# Altium PCB PCB1.PcbDoc (part 3 of 3)
Units mm, origin at the board's own origin, x right, y up, seen from the top; angles counter-clockwise.
Board outline 145 x 122 mm, 4 copper layers (Top Layer, Middle Layer 1, Middle Layer 2, Bottom Layer), stack 1.466 mm thick; 149 components, 242 nets, 995 pads, 740 vias.
Unrouted connection lines stored in the file: 53.
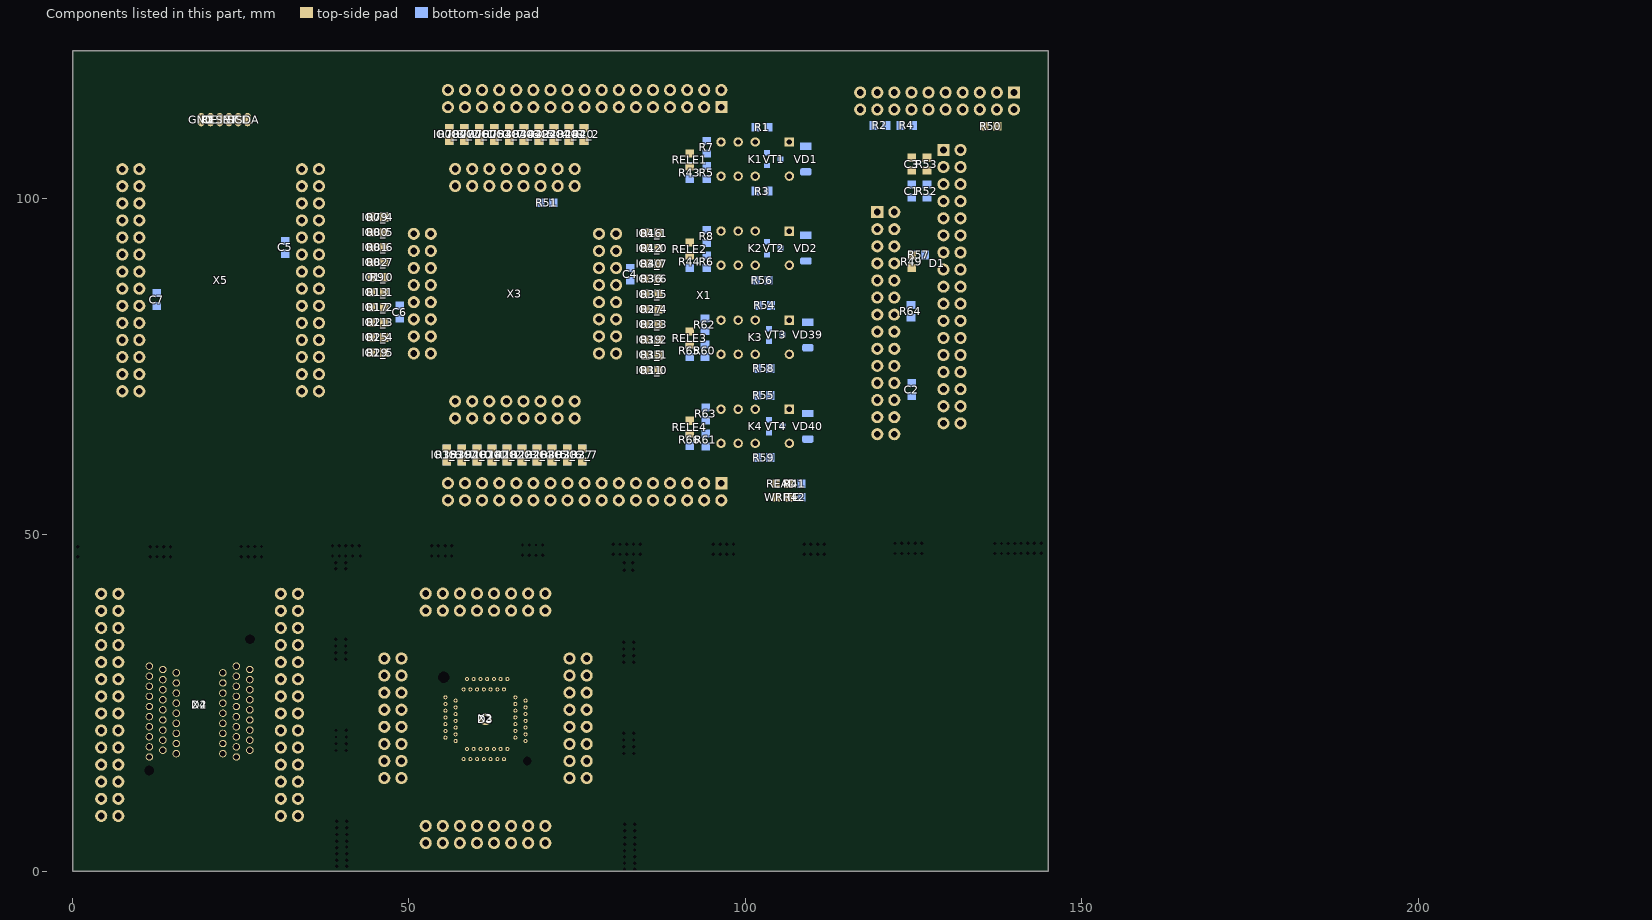
[diagram p5: the components of this part, seen from the top]

## Other copper
Top Layer:
  pour cut-out: 21.625,28.875 21.625,27.5 23.125,27.5
  pour cut-out: 29.846,41.26 29.846,38.72 30.955,38.72
  pour cut-out: 25.25,20.375 25.25,18.5 27.5,18.5 27.5,20.125
  pour cut-out: 21.625,22.75 21.625,21.304 23.5,21.304 23.5,22.625
  pour cut-out: 76.066,107.68 77.813,107.68 77.813,107.927
  pour cut-out: 84.827,95.725 82.75,95.725 82.75,94.319
  pour cut-out: 78.099,94.185 78.099,91.786 77.46,91.786
  pour cut-out: 78.123,95.912 76.625,95.912 76.625,95.125
  pour cut-out: 129.45,103.586 127,103.586 127,104.175
  pour cut-out: 129.45,105.804 127,105.804 127,104.175
  pour cut-out: 7.38,105.494 9.92,105.494 9.92,104.404
  pour cut-out: 49.984,31.64 49.984,29.1 48.875,29.1
  pour cut-out: 46.335,32.749 48.875,32.749 48.875,31.64
  pour cut-out: 87.875,73.65 87.875,72.75 84.375,72.75
  pour cut-out: 87.875,73.65 84.375,73.65 84.375,72.75
  pour cut-out: 54.359,79.525 54.359,76.985 53.25,76.985
  pour cut-out: 46.45,77.712 50.71,77.712 50.71,79.866
  pour cut-out: 80.79,75.876 85.3,75.876 85.3,76.764
  pour cut-out: 80.623,93.334 85.175,93.334 85.175,92.611
  pour cut-out: 51.875,78.125 51.875,75.838 54.296,75.838
  pour cut-out: 55.713,69.748 54.5,69.748 54.5,69
  pour cut-out: 70.875,68.56 70.875,63.25 75.25,63.25
  pour cut-out: 98.695,96.052 94.25,96.052 94.25,95
  pour cut-out: 123.9,92.375 123.9,88.875 125.6,88.875 125.6,92.375
  pour cut-out: 131.99,103.586 129.45,103.586 129.45,104.695
  pour cut-out: 129.45,105.804 131.99,105.804 131.99,104.695
  pour cut-out: 126.15,106.875 126.15,103.375 127.85,103.375 127.85,106.875
  pour cut-out: 134.75,111.6 134.75,109.9 138.25,109.9 138.25,111.6
  pour cut-out: 76.875,111.25 78.65,111.25 78.65,113.595
  pour cut-out: 79.759,113.595 79.759,110.75 79.201,110.75
  pour cut-out: 65.95,114.704 78.65,114.704 78.65,113.595
  pour cut-out: 64.841,113.595 64.841,112 65.375,112
  pour cut-out: 74.628,111.3 76.875,111.3 76.875,107.68 74.698,107.68
  pour cut-out: 74.64,103.306 76.75,103.306 76.75,105.625
  pour cut-out: 74.64,103.306 72.1,103.306 72.1,104.415
  pour cut-out: 73.209,104.415 73.209,101.875 72.1,101.875
  pour cut-out: 57.051,104.083 57.051,100.771 60.312,100.771
  pour cut-out: 58.125,104.813 58.125,103.125 60.875,103.125
  pour cut-out: 59.4,100.766 72.1,100.766 72.1,101.875
  pour cut-out: 58.125,105.125 60.625,105.125 60.625,106.197
  pour cut-out: 56.987,105.562 56.987,108 58.125,108
  pour cut-out: 55.15,111.3 55.15,107.8 74.628,107.8 74.628,111.3
  pour cut-out: 123.259,80.215 123.259,90.375 122.15,90.375
  pour cut-out: 119.61,79.106 122.15,79.106 122.15,80.215
  pour cut-out: 118.501,90.375 118.501,80.215 119.61,80.215
  pour cut-out: 118.501,90.375 118.501,92.915 119.61,92.915
  pour cut-out: 123.259,92.915 123.259,90.375 122.15,90.375
  pour cut-out: 119.61,94.024 122.15,94.024 122.15,92.915
  pour cut-out: 118.501,92.915 118.501,91.645 119.61,91.645
  pour cut-out: 111.75,94.125 111.75,92.5 111.125,92.5
  pour cut-out: 99.838,95.176 99.838,92.5 98.573,92.5
  pour cut-out: 98.573,94.349 98.573,92.5 99.5,92.5
  pour cut-out: 93.125,97.125 94.25,97.125 94.25,96.266
  pour cut-out: 99.838,90.096 99.838,92.5 98.5,92.5
  pour cut-out: 102.378,63.617 102.378,65.875 100.625,65.875
  pour cut-out: 98.93,62.709 101.47,62.709 101.47,63.617
  pour cut-out: 93.615,63.175 93.615,62.255 94.125,62.255
  pour cut-out: 96.39,67.789 98.93,67.789 98.93,68.697
  pour cut-out: 95.482,68.697 95.482,69.875 96.125,69.875
  pour cut-out: 102.378,76.856 102.378,78.375 101,78.375
  pour cut-out: 98.93,75.948 101.47,75.948 101.47,76.856
  pour cut-out: 99.165,80.582 99.165,78.25 98.25,78.25
  pour cut-out: 84.375,95.725 87.875,95.725 87.875,73.65 84.375,73.65
  pour cut-out: 79.681,79.525 79.681,76.985 80.79,76.985
  pour cut-out: 79.681,79.525 79.681,82.065 80.79,82.065
  pour cut-out: 78.25,80.956 80.79,80.956 80.79,82.065
  pour cut-out: 78.25,93.334 80.79,93.334 80.79,92.225
  pour cut-out: 81.899,76.985 81.899,92.225 80.79,92.225
  pour cut-out: 78.25,75.876 80.79,75.876 80.79,76.985
  pour cut-out: 77.141,92.225 77.141,82.065 78.25,82.065
  pour cut-out: 54.775,60.147 76.6,60.147 76.6,63.647 54.75,63.647 54.75,63.625
  pour cut-out: 74.459,69.506 74.459,71.5 72.813,71.5
  pour cut-out: 74.459,69.506 74.459,67.756 73.334,67.756
  pour cut-out: 74.513,66.188 73.375,66.188 73.375,67.125
  pour cut-out: 72.227,66.188 73.375,66.188 73.375,67.125
  pour cut-out: 71.973,66.188 70.875,66.188 70.875,67.375
  pour cut-out: 70.875,67.75 73.375,67.75 73.375,68.6
  pour cut-out: 55.875,69.658 59.4,69.658 59.4,68.537
  pour cut-out: 55.713,69.748 55.713,67.335 56.86,67.335
  pour cut-out: 69.764,66.252 70.875,66.252 70.875,67.023
  pour cut-out: 73.209,69.875 73.209,71.625 72.25,71.625
  pour cut-out: 59.4,70.984 72.1,70.984 72.1,69.875
  pour cut-out: 57.147,66.263 69.56,66.263 69.56,67.335
  pour cut-out: 53.377,75.838 54.5,75.838 54.5,76.75
  pour cut-out: 53.123,75.838 52,75.838 52,76.625
  pour cut-out: 50.837,75.838 52,75.838 52,76.625
  pour cut-out: 49.563,77.112 49.563,79.525 50.71,79.525
  pour cut-out: 53.25,90.794 50.698,90.794 50.698,89.673
  pour cut-out: 54.359,79.525 54.359,89.685 53.25,89.685
  pour cut-out: 50.71,78.416 53.25,78.416 53.25,79.525
  pour cut-out: 49.601,79.525 49.601,82.065 50.71,82.065
  pour cut-out: 51.819,92.225 51.819,79.525 50.71,79.525
  pour cut-out: 53.25,93.656 50.605,93.656 50.605,94.87
  pour cut-out: 51.819,92.225 51.819,94.765 50.71,94.765
  pour cut-out: 50.71,95.874 53.25,95.874 53.25,94.765
  pour cut-out: 43.625,98.1 47.125,98.1 47.125,76.275 43.625,76.275
  pour cut-out: 35.511,76.445 35.511,78.985 36.62,78.985
  pour cut-out: 34.08,77.876 36.62,77.876 36.62,78.985
  pour cut-out: 34.08,70.256 36.62,70.256 36.62,71.365
  pour cut-out: 35.511,76.445 35.511,73.905 36.62,73.905
  pour cut-out: 34.08,75.014 36.62,75.014 36.62,73.905
  pour cut-out: 32.971,71.365 32.971,73.905 34.08,73.905
  pour cut-out: 37.729,81.525 37.729,71.365 36.62,71.365
  pour cut-out: 36.62,82.634 34.08,82.634 34.08,81.525
  pour cut-out: 35.189,84.065 35.189,81.525 34.08,81.525
  pour cut-out: 35.189,84.065 35.189,86.605 34.08,86.605
  pour cut-out: 36.62,97.874 34.08,97.874 34.08,96.765
  pour cut-out: 35.189,99.305 35.189,96.765 34.08,96.765
  pour cut-out: 36.62,85.496 34.08,85.496 34.08,86.605
  pour cut-out: 37.729,96.765 37.729,86.605 36.62,86.605
  pour cut-out: 35.125,99.375 35.125,101.845 34.08,101.845
  pour cut-out: 36.62,100.736 34.08,100.736 34.08,101.845
  pour cut-out: 37.729,104.385 37.729,101.845 36.62,101.845
  pour cut-out: 33.004,104.13 33.004,78.985 34.08,78.985
  pour cut-out: 34.08,103.276 36.62,103.276 36.62,104.385
  pour cut-out: 26,110.544 20.5,110.544 20.5,111.75
  pour cut-out: 20.5,112.956 26,112.956 26,111.75
  pour cut-out: 11.029,94.225 11.029,91.685 9.92,91.685
  pour cut-out: 8.811,91.685 8.811,89.145 9.92,89.145
  pour cut-out: 7.38,90.254 9.92,90.254 9.92,89.145
  pour cut-out: 6.271,78.985 6.271,89.145 7.38,89.145
  pour cut-out: 7.38,77.876 9.92,77.876 9.92,78.985
  pour cut-out: 8.811,76.445 8.811,78.985 9.92,78.985
  pour cut-out: 8.811,76.445 8.811,73.905 9.92,73.905
  pour cut-out: 7.38,75.014 9.92,75.014 9.92,73.905
  pour cut-out: 6.271,71.365 6.271,73.905 7.38,73.905
  pour cut-out: 9.92,70.256 7.38,70.256 7.38,71.365
  pour cut-out: 11.029,91.685 11.029,71.365 9.92,71.365
  pour cut-out: 8.811,91.685 8.811,94.225 9.92,94.225
  pour cut-out: 8.489,99.305 8.489,101.845 7.38,101.845
  pour cut-out: 8.489,99.305 8.489,96.765 7.38,96.765
  pour cut-out: 9.92,97.874 7.38,97.874 7.38,96.765
  pour cut-out: 11.029,94.225 11.029,96.765 9.92,96.765
  pour cut-out: 7.38,93.116 9.92,93.116 9.92,94.225
  pour cut-out: 6.271,101.845 6.271,94.225 7.38,94.225
  pour cut-out: 7.38,100.736 9.92,100.736 9.92,101.845
  pour cut-out: 6.271,104.385 6.271,101.845 7.38,101.845
  pour cut-out: 11.029,104.385 11.029,101.845 9.92,101.845
  pour cut-out: 7.38,103.276 9.92,103.276 9.92,104.385
  pour cut-out: 72.766,13.86 72.766,16.4 73.875,16.4
  pour cut-out: 76.415,12.751 73.875,12.751 73.875,13.86
  pour cut-out: 77.524,29.1 77.524,13.86 76.415,13.86
  pour cut-out: 75.255,30.49 74.625,30.49 74.625,31.125
  pour cut-out: 72.728,31.513 72.728,30 73.25,30
  pour cut-out: 68.834,4.21 68.834,5.75 68.25,5.75
  pour cut-out: 69.115,5.37 69.115,6 69.625,6
  pour cut-out: 51.376,4.21 51.376,6.75 52.485,6.75
  pour cut-out: 67.725,3.101 52.485,3.101 52.485,4.21
  pour cut-out: 70.138,7.897 68.125,7.897 68.125,6.875
  pour cut-out: 52.485,7.859 67.725,7.859 67.725,6.75
  pour cut-out: 58.125,17.18 64.125,17.18 64.125,16.67
  pour cut-out: 58.625,17.685 64.625,17.685 64.625,18.195
  pour cut-out: 64.625,18.705 58.625,18.705 58.625,18.195
  pour cut-out: 66.82,25.375 66.82,19.375 67.33,19.375
  pour cut-out: 66.315,19.875 66.315,25.875 65.805,25.875
  pour cut-out: 65.295,25.875 65.295,19.875 65.805,19.875
  pour cut-out: 64.125,26.545 58.125,26.545 58.125,27.055
  pour cut-out: 58.125,27.565 64.125,27.565 64.125,27.055
  pour cut-out: 58.625,28.07 64.625,28.07 64.625,28.58
  pour cut-out: 57.455,19.375 57.455,25.375 56.945,25.375
  pour cut-out: 56.435,25.375 56.435,19.375 56.945,19.375
  pour cut-out: 55.93,25.875 55.93,19.875 55.42,19.875
  pour cut-out: 50.022,13.987 50.022,16.4 48.875,16.4
  pour cut-out: 47.495,15.01 48.125,15.01 48.125,14.375
  pour cut-out: 45.226,31.64 45.226,16.4 46.335,16.4
  pour cut-out: 52.612,37.603 55.025,37.603 55.025,38.75
  pour cut-out: 53.635,40.13 53.635,39.5 53,39.5
  pour cut-out: 70.265,37.641 53.916,37.641 53.916,41.29
  pour cut-out: 71.374,41.29 71.374,38.75 70.265,38.75
  pour cut-out: 55.025,42.399 70.265,42.399 70.265,41.29
  pour cut-out: 33.495,7.131 30.875,7.131 30.875,8.24 30.955,8.24
  pour cut-out: 33.286,37.84 33.286,31 28.5,31 28.5,38.625
  pour cut-out: 34.604,33.64 34.604,23.48 33.495,23.48
  pour cut-out: 33.32,35.507 33.32,33.64 30.086,33.64
  pour cut-out: 33.286,36.96 33.286,38.72 30.237,38.72
  pour cut-out: 34.604,41.26 34.604,38.72 33.495,38.72
  pour cut-out: 30.955,42.369 33.495,42.369 33.495,41.26
  pour cut-out: 33.333,21.961 33.333,18.4 30.955,18.4
  pour cut-out: 33.308,20 33.308,18.4 30.536,18.4
  pour cut-out: 33.333,21.961 33.333,23.48 30.701,23.48
  pour cut-out: 33.495,22.371 30.955,22.371 30.955,23.48
  pour cut-out: 33.495,19.509 30.955,19.509 30.955,18.4
  pour cut-out: 34.604,13.32 34.604,18.4 33.495,18.4
  pour cut-out: 29.25,14.75 32.5,14.75 32.5,11.875 29.625,11.875
  pour cut-out: 34.604,8.24 34.604,13.32 33.495,13.32
  pour cut-out: 21.75,20 21.75,18.125 23.584,18.125 23.584,20
  pour cut-out: 24.536,31.231 30.955,31.231 30.955,28.56
  pour cut-out: 24.178,31.235 21.609,31.235 21.609,29.696
  pour cut-out: 24.178,16.265 21.584,16.265 21.584,17.5
  pour cut-out: 21.584,29.5 21.584,17.5 22.34,17.5
  pour cut-out: 15.41,16.744 11.41,16.744 11.41,18.5
  pour cut-out: 13.606,30.731 16.166,30.731 16.166,29.5
  pour cut-out: 16.166,29.5 16.166,17.5 15.41,17.5
  pour cut-out: 14.654,17.5 14.654,29.5 15.41,29.5
  pour cut-out: 11.75,28.25 13.875,28.25 13.875,24.25 12.375,24.25
  pour cut-out: 14.166,18 14.166,30 13.41,30
  pour cut-out: 13.41,17.244 11.41,17.244 11.41,18.5
  pour cut-out: 11.375,14.067 6.795,14.067 6.795,15.86
  pour cut-out: 12.308,15 12.308,21.5 11.41,21.5
  pour cut-out: 4.536,12.18 4.536,10.787 6.949,10.787
  pour cut-out: 4.255,7.131 6.795,7.131 6.795,8.24
  pour cut-out: 3.146,10.78 3.146,8.24 4.255,8.24
  pour cut-out: 4.382,12.173 6.795,12.173 6.795,13.32
  pour cut-out: 4.526,14.395 4.526,15.788 6.939,15.788
  pour cut-out: 4.255,14.751 6.795,14.751 6.795,15.86
  pour cut-out: 4.382,14.467 6.75,14.467 6.75,13.32 6.795,13.32
  pour cut-out: 3.146,23.48 3.146,15.86 4.255,15.86
  pour cut-out: 3.146,26.02 3.146,23.48 4.255,23.48
  pour cut-out: 8.213,27.625 8.213,24.5 11.41,24.5
  pour cut-out: 6.795,27.129 11.41,27.129 11.41,26
  pour cut-out: 4.255,27.129 6.795,27.129 6.795,26.02
  pour cut-out: 6.795,29.991 11.41,29.991 11.41,30.5
  pour cut-out: 4.255,29.991 6.795,29.991 6.795,31.1
  pour cut-out: 3.146,33.64 3.146,31.1 4.255,31.1
  pour cut-out: 5.125,38.125 8.375,38.125 8.375,34.375 4.875,34.375
  pour cut-out: 3.146,38.72 3.146,36.18 4.255,36.18
  pour cut-out: 3.146,36.18 3.146,33.64 4.255,33.64
  pour cut-out: 6.795,37.611 11.375,37.611 11.375,38.25
  pour cut-out: 4.255,37.611 6.795,37.611 6.795,38.72
  pour cut-out: 3.146,41.26 3.146,38.72 4.255,38.72
  pour cut-out: 4.255,42.369 6.795,42.369 6.795,41.26
Middle Layer 1:
  pour cut-out: 27.096,30 27.096,27 26.34,27
  pour cut-out: 25.584,30 25.584,27 26.34,27
  pour cut-out: 27.096,21 27.096,24 26.34,24
  pour cut-out: 25.584,24 25.584,21 26.34,21
  pour cut-out: 23.096,17.5 23.096,20.5 22.34,20.5
  pour cut-out: 21.584,20.5 21.584,17.5 22.34,17.5
  pour cut-out: 23.096,23.5 23.096,26.5 22.34,26.5
  pour cut-out: 21.584,26.5 21.584,23.5 22.34,23.5
  pour cut-out: 82.071,104.4 82.071,106.875 83,106.875
  pour cut-out: 50.71,95.874 52.141,95.874 53.25,94.765
  pour cut-out: 44.23,91.013 49.092,95.874 50.71,95.874
  pour cut-out: 43.062,88.129 43.062,89.899 44.065,90.902
  pour cut-out: 70.5,69.125 73.125,68.875 73.25,65.625 70.625,65.625
  pour cut-out: 129.45,65.486 126.25,65.486 126.25,66.25
  pour cut-out: 133.099,66.595 133.099,69.135 131.99,69.135
  pour cut-out: 129.45,65.486 131.99,65.486 131.99,66.595
  pour cut-out: 128.341,66.595 128.341,69.135 129.45,69.135
  pour cut-out: 131.99,68.026 129.45,68.026 129.45,69.135
  pour cut-out: 129.45,70.244 131.99,70.244 131.99,69.135
  pour cut-out: 53.25,78.416 55,78.416 55,79.125
  pour cut-out: 53.25,78.416 52,78.416 52,79
  pour cut-out: 49.375,77.875 49.375,75.25 51.5,75.625 51.75,78
  pour cut-out: 55.79,58.804 53.625,58.804 53.625,57.75
  pour cut-out: 93.89,54.046 55.79,54.046 55.79,55.155
  pour cut-out: 94.999,57.695 94.999,55.155 93.89,55.155
  pour cut-out: 55.79,58.804 93.89,58.804 93.89,57.695
  pour cut-out: 56.86,68.444 59.4,68.444 59.4,67.335
  pour cut-out: 69.56,66.252 70.875,66.252 70.875,67.25
  pour cut-out: 56.656,66.252 69.56,66.252 69.56,67.335
  pour cut-out: 58.291,69.875 58.291,67.335 59.4,67.335
  pour cut-out: 72.1,68.766 59.4,68.766 59.4,69.875
  pour cut-out: 59.4,70.984 72.1,70.984 72.1,69.875
  pour cut-out: 81.905,87.145 81.905,89.75 80.625,89.75
  pour cut-out: 78.25,86.036 80.79,86.036 80.79,87.145
  pour cut-out: 77.141,92.225 77.141,87.145 78.25,87.145
  pour cut-out: 58.125,105.125 58.125,102.875 60.75,102.875 60.75,105.75
  pour cut-out: 65.95,117.244 78.65,117.244 78.65,116.135
  pour cut-out: 65.95,117.244 64.75,117.244 64.75,116.75
  pour cut-out: 58.33,112.486 68.49,112.486 68.49,113.595
  pour cut-out: 76.11,114.704 58.33,114.704 58.33,113.595
  pour cut-out: 76.11,114.704 78.65,114.704 78.65,113.595
  pour cut-out: 76.51,110.5 76.51,113.595 76.11,113.595
  pour cut-out: 77.541,113.595 77.541,109.75 78.375,109.75
  pour cut-out: 81.078,105.437 84.25,105.437 84.25,106.375
  pour cut-out: 77.541,116.135 77.541,113.595 78.65,113.595
  pour cut-out: 96.43,117.244 78.65,117.244 78.65,116.135
  pour cut-out: 73.209,101.875 73.209,104.415 72.1,104.415
  pour cut-out: 74.64,103.306 72.1,103.306 72.1,104.415
  pour cut-out: 75.749,104.415 75.749,106.625 74.875,106.625
  pour cut-out: 59.4,100.766 72.1,100.766 72.1,101.875
  pour cut-out: 55.504,91.925 55.504,89 54.75,89
  pour cut-out: 51.75,93.5 54.75,93.5 54.5,91.125 51.9,90.875
  pour cut-out: 6.271,86.605 6.271,89.145 7.38,89.145
  pour cut-out: 9.92,77.876 14.375,77.876 14.375,79.5
  pour cut-out: 7.38,77.876 9.92,77.876 9.92,78.985
  pour cut-out: 6.271,86.605 6.271,78.985 7.38,78.985
  pour cut-out: 7.38,90.254 9.92,90.254 9.92,89.145
  pour cut-out: 8.811,91.685 8.811,89.145 9.92,89.145
  pour cut-out: 8.811,91.685 8.811,94.225 9.92,94.225
  pour cut-out: 7.38,93.116 9.92,93.116 9.92,94.225
  pour cut-out: 6.271,96.765 6.271,94.225 7.38,94.225
  pour cut-out: 9.92,97.874 7.38,97.874 7.38,96.765
  pour cut-out: 64.625,28.07 59.625,28.07 59.625,28.58
  pour cut-out: 59.625,29.09 64.625,29.09 64.625,28.58
  pour cut-out: 63.125,26.545 58.125,26.545 58.125,27.055
  pour cut-out: 58.125,27.565 63.125,27.565 63.125,27.055
  pour cut-out: 65.295,25.875 65.295,21.875 65.805,21.875
  pour cut-out: 66.315,21.875 66.315,25.875 65.805,25.875
  pour cut-out: 66.82,25.375 66.82,19.375 67.33,19.375
  pour cut-out: 67.84,19.375 67.84,25.375 67.33,25.375
  pour cut-out: 64.625,18.705 59.625,18.705 59.625,18.195
  pour cut-out: 59.625,17.685 64.625,17.685 64.625,18.195
  pour cut-out: 63.125,17.18 58.125,17.18 58.125,16.67
  pour cut-out: 58.125,16.16 63.125,16.16 63.125,16.67
  pour cut-out: 57.455,19.375 57.455,23.375 56.945,23.375
  pour cut-out: 56.435,23.375 56.435,19.375 56.945,19.375
  pour cut-out: 55.93,19.875 55.93,25.875 55.42,25.875
  pour cut-out: 54.91,25.875 54.91,19.875 55.42,19.875
  pour cut-out: 27.096,27 27.096,24 26.34,24
  pour cut-out: 25.584,24 25.584,27 26.34,27
  pour cut-out: 25.096,30.5 25.096,17 24.34,17
  pour cut-out: 23.584,17 23.584,30.5 24.34,30.5
  pour cut-out: 16.166,26.5 16.166,17.5 15.41,17.5
  pour cut-out: 14.654,17.5 14.654,26.5 15.41,26.5
  pour cut-out: 14.166,21 14.166,24 13.41,24
  pour cut-out: 12.654,24 12.654,21 13.41,21
  pour cut-out: 14.166,27 14.166,30 13.41,30
  pour cut-out: 12.654,30 12.654,27 13.41,27
  pour cut-out: 12.166,17 12.166,30.5 11.41,30.5
  pour cut-out: 10.654,30.5 10.654,17 11.41,17
Middle Layer 2:
  pour cut-out: 27.096,27 27.096,30 26.34,30
  pour cut-out: 25.584,30 25.584,27 26.34,27
  pour cut-out: 27.096,18 27.096,24 26.34,24
  pour cut-out: 25.584,24 25.584,18 26.34,18
  pour cut-out: 23.096,17.5 23.096,28 22.34,28
  pour cut-out: 21.584,26.5 21.584,17.5 22.34,17.5
  pour cut-out: 54.359,80.775 54.359,78.275 53.109,78.275
  pour cut-out: 54.375,83.375 54.375,80.634 53.25,80.634
  pour cut-out: 118.34,66.285 118.34,63.866 122.15,63.866
  pour cut-out: 87.075,73.99 85.75,73.99 85.75,74.25
  pour cut-out: 87.585,83.556 87.585,74.344 87.27,74.029
  pour cut-out: 87.435,83.916 83.689,87.451 81.899,87.451
  pour cut-out: 75.75,61.456 77.375,61.456 77.375,61
  pour cut-out: 75.24,60.947 75.24,59.5 75.5,59.5
  pour cut-out: 54.375,88.375 54.375,85.875 53.25,85.875
  pour cut-out: 59.875,83.375 59.875,84.375 60.75,84.375
  pour cut-out: 79.508,75.437 85,75.437 85,77.5
  pour cut-out: 51.819,92.225 51.819,89.673 50.698,89.673
  pour cut-out: 42.75,82.875 39.85,82.875 39.85,84.525
  pour cut-out: 76.204,103.055 76.204,106.75 75.206,106.75
  pour cut-out: 73.25,103 73.25,100.875 75.875,100.875 75.875,102.625
  pour cut-out: 61.94,105.524 67.02,105.524 67.02,104.415
  pour cut-out: 60.831,104.415 60.831,101.875 61.94,101.875
  pour cut-out: 59.4,102.984 61.94,102.984 61.94,101.875
  pour cut-out: 119.61,76.244 122.15,76.244 122.15,75.135
  pour cut-out: 123.259,75.135 123.259,72.595 122.15,72.595
  pour cut-out: 118.501,72.595 118.501,75.135 119.61,75.135
  pour cut-out: 118.501,72.595 118.501,70.055 119.61,70.055
  pour cut-out: 123.259,64.975 123.259,67.515 122.15,67.515
  pour cut-out: 121.041,64.975 121.041,67.515 122.15,67.515
  pour cut-out: 123.259,70.055 123.259,67.515 122.15,67.515
  pour cut-out: 119.61,71.164 122.15,71.164 122.15,70.055
  pour cut-out: 129.45,88.346 127.5,88.346 127.5,90.045
  pour cut-out: 130.559,89.455 130.559,91.995 129.45,91.995
  pour cut-out: 130.559,91.995 130.559,94.535 129.45,94.535
  pour cut-out: 131.99,93.426 129.45,93.426 129.45,94.535
  pour cut-out: 133.099,97.075 133.099,94.535 131.99,94.535
  pour cut-out: 129.45,98.184 131.99,98.184 131.99,97.075
  pour cut-out: 128.341,97.075 128.341,94.535 129.45,94.535
  pour cut-out: 73.57,58.804 76.11,58.804 76.11,57.695
  pour cut-out: 72.461,55.155 72.461,57.695 73.57,57.695
  pour cut-out: 93.89,54.046 73.57,54.046 73.57,55.155
  pour cut-out: 94.999,57.695 94.999,55.155 93.89,55.155
  pour cut-out: 93.89,58.804 91.35,58.804 91.35,57.695
  pour cut-out: 55.751,67.335 55.751,64.5 57.125,64.5
  pour cut-out: 58.291,69.875 58.291,67.335 59.4,67.335
  pour cut-out: 56.86,68.444 59.4,68.444 59.4,67.335
  pour cut-out: 58.291,69.875 58.291,71.375 58.875,71.375
  pour cut-out: 69.56,66.226 64.48,66.226 64.48,67.335
  pour cut-out: 70.669,67.335 70.669,69.875 69.56,69.875
  pour cut-out: 73.209,69.875 73.209,75.625 70.574,75.625
  pour cut-out: 72.1,68.766 69.56,68.766 69.56,69.875
  pour cut-out: 76.375,81.375 79.646,81.375 79.646,78 76.75,78
  pour cut-out: 81.899,92.225 81.899,76.985 80.79,76.985
  pour cut-out: 78.25,93.334 80.79,93.334 80.79,92.225
  pour cut-out: 77.141,92.225 77.141,82.065 78.25,82.065
  pour cut-out: 77.141,92.225 77.141,93.334 78.25,93.334
  pour cut-out: 41.875,93.5 41.875,92 41.5,92
  pour cut-out: 44.935,92.778 44.935,93.5 44.375,93.5
  pour cut-out: 43.915,92.778 43.915,93.5 44.375,93.5
  pour cut-out: 44.785,90.181 44.125,90.181 44.125,89.75
  pour cut-out: 44.065,90.902 44.065,90.37 43.505,90.37
  pour cut-out: 54.359,79.525 54.359,78.25 53.625,78.25
  pour cut-out: 50.71,80.634 53.25,80.634 53.25,79.525
  pour cut-out: 49.601,79.525 49.601,78.25 50,78.25
  pour cut-out: 51.819,92.225 51.819,94.765 50.71,94.765
  pour cut-out: 49.601,92.225 49.601,94.765 50.71,94.765
  pour cut-out: 54.359,94.765 54.359,93.375 53.75,93.375
  pour cut-out: 54.359,94.765 54.359,96.375 52.875,96.375
  pour cut-out: 49.601,94.765 49.601,96.55 50.5,96.55
  pour cut-out: 35.25,101 38.5,101 38.5,97.625 35.5,97.625
  pour cut-out: 35.265,85.25 37.875,85.25 37.875,82.5 35.75,82.5
  pour cut-out: 35.511,76.445 35.511,73.905 36.62,73.905
  pour cut-out: 34.08,70.256 36.62,70.256 36.62,71.365
  pour cut-out: 32.971,73.905 32.971,71.365 34.08,71.365
  pour cut-out: 35.511,76.445 35.511,78.985 36.62,78.985
  pour cut-out: 34.08,77.876 36.62,77.876 36.62,78.985
  pour cut-out: 32.971,104.385 32.971,78.985 34.08,78.985
  pour cut-out: 32.971,104.385 32.971,106.625 34.125,106.625
  pour cut-out: 7.38,70.256 9.92,70.256 9.92,71.365
  pour cut-out: 6.271,71.365 6.271,73.905 7.38,73.905
  pour cut-out: 8.811,76.445 8.811,71.365 9.92,71.365
  pour cut-out: 8.811,78.985 8.811,76.445 9.92,76.445
  pour cut-out: 6.271,94.225 6.271,99.305 7.38,99.305
  pour cut-out: 8.489,99.305 8.489,94.225 7.38,94.225
  pour cut-out: 9.92,100.736 7.38,100.736 7.38,101.845
  pour cut-out: 8.489,99.305 8.489,101.845 7.38,101.845
  pour cut-out: 11.029,101.845 11.029,104.385 9.92,104.385
  pour cut-out: 67.84,19.375 67.84,23.375 67.33,23.375
  pour cut-out: 66.82,23.375 66.82,19.375 67.33,19.375
  pour cut-out: 66.315,19.875 66.315,25.875 65.805,25.875
  pour cut-out: 65.295,25.875 65.295,19.875 65.805,19.875
  pour cut-out: 64.625,28.07 58.625,28.07 58.625,28.58
  pour cut-out: 58.625,29.09 64.625,29.09 64.625,28.58
  pour cut-out: 64.125,26.545 58.125,26.545 58.125,27.055
  pour cut-out: 58.125,27.565 64.125,27.565 64.125,27.055
  pour cut-out: 64.625,18.705 58.625,18.705 58.625,18.195
  pour cut-out: 58.625,17.685 64.625,17.685 64.625,18.195
  pour cut-out: 64.125,17.18 58.125,17.18 58.125,16.67
  pour cut-out: 58.125,16.16 64.125,16.16 64.125,16.67
  pour cut-out: 57.455,19.375 57.455,25.375 56.945,25.375
  pour cut-out: 56.435,25.375 56.435,19.375 56.945,19.375
  pour cut-out: 55.93,25.875 55.93,21.875 55.42,21.875
  pour cut-out: 54.91,25.875 54.91,21.875 55.42,21.875
  pour cut-out: 25.096,30.5 25.096,17 24.34,17
  pour cut-out: 23.584,17 23.584,30.5 24.34,30.5
  pour cut-out: 23.096,29.5 23.096,26.5 22.34,26.5
  pour cut-out: 21.584,29.5 21.584,26.5 22.34,26.5
  pour cut-out: 16.166,17.5 16.166,20.5 15.41,20.5
  pour cut-out: 14.654,20.5 14.654,17.5 15.41,17.5
  pour cut-out: 16.166,23.5 16.166,29.5 15.41,29.5
  pour cut-out: 14.654,29.5 14.654,23.5 15.41,23.5
  pour cut-out: 14.166,18 14.166,30 13.41,30
  pour cut-out: 12.654,30 12.654,18 13.41,18
  pour cut-out: 12.166,17 12.166,30.5 11.41,30.5
  pour cut-out: 10.654,30.5 10.654,17 11.41,17
Bottom Layer:
  pour cut-out: 25.375,20.625 25.375,18.375 27.5,18.375 27.5,20.75
  pour cut-out: 21.75,22.75 21.75,21.375 23.125,21.375 23.125,22.625
  pour cut-out: 22.241,16.75 24.051,16.75 24.051,16.301
  pour cut-out: 21.625,28.625 21.625,27.375 23.089,27.375 23.089,28.31
  pour cut-out: 22.241,30.25 24.085,30.25 24.085,31.208
  pour cut-out: 123.259,85.295 123.259,90.375 122.15,90.375
  pour cut-out: 79.759,57.695 79.759,60.375 78.875,60.375
  pour cut-out: 76.11,56.586 78.65,56.586 78.65,57.695
  pour cut-out: 16.16,29.599 16.16,17.5 15.41,17.5
  pour cut-out: 7.895,41.115 7.895,38.625 6.875,38.625
  pour cut-out: 29.855,41.115 29.855,38.72 30.955,38.72
  pour cut-out: 110.495,106.61 110.495,105.313 110.938,105.313
  pour cut-out: 11.957,84.85 9.92,84.85 9.92,83.926
  pour cut-out: 9.92,82.956 12.5,82.956 12.5,84.05
  pour cut-out: 32.136,92.6 34.08,92.6 34.08,91.492
  pour cut-out: 34.08,90.576 31.625,90.576 31.625,91.8
  pour cut-out: 50.71,80.956 48.625,80.956 48.625,82.12
  pour cut-out: 83.725,90.5 80.79,90.5 80.79,89.685
  pour cut-out: 119.61,71.486 122.15,71.486 122.15,72.595
  pour cut-out: 119.61,71.486 116.25,71.486 116.25,71.875
  pour cut-out: 118.501,72.595 118.501,75.135 119.61,75.135
  pour cut-out: 119.61,73.704 122.15,73.704 122.15,72.595
  pour cut-out: 129.43,101.048 127.04,101.048 127.04,102.115
  pour cut-out: 126.15,102.875 126.15,99.375 127.85,99.375 127.85,102.875
  pour cut-out: 93.15,81.1 94.85,81.1 94.85,75.694 93.15,75.694
  pour cut-out: 90.9,79.146 94.85,79.146 94.85,75.646 90.9,75.646
  pour cut-out: 101,75.6 104.5,75.6 104.5,73.9 101,73.9
  pour cut-out: 105.642,76.856 105.642,79.733 107.093,79.733
  pour cut-out: 101.125,84.975 104.625,84.975 104.625,83.275 101.125,83.275
  pour cut-out: 100.75,88.725 104.25,88.725 104.25,87.025 100.75,87.025
  pour cut-out: 105.642,90.096 105.642,92.5 106.813,92.5
  pour cut-out: 93.4,94.225 93.4,88.875 95.1,88.875 95.1,94.25 94.875,94.25
  pour cut-out: 90.9,92.375 90.9,88.875 95.1,88.875 95.1,92.375
  pour cut-out: 98.93,94.268 101.47,94.268 101.47,95.165
  pour cut-out: 84.375,95.725 88.875,95.725 88.875,73.53 84.4,73.53
  pour cut-out: 82.697,88.011 82.697,89.7 80.79,89.7
  pour cut-out: 79.681,89.685 79.681,87.145 80.79,87.145
  pour cut-out: 80.79,88.254 81.971,88.254 81.971,87.5
  pour cut-out: 80.79,86.036 82.697,86.036 82.697,87.217
  pour cut-out: 70.669,101.875 70.669,99.375 69.55,99.375
  pour cut-out: 68.451,101.875 68.451,98.525 72.25,98.525
  pour cut-out: 68.75,100.225 68.75,98.525 72.25,98.525 72.25,100.225
  pour cut-out: 76.85,111.3 76.85,107.8 55.15,107.8 55.15,111.3
  pour cut-out: 93.4,107.475 93.4,102.125 95.1,102.125 95.1,107.475
  pour cut-out: 90.9,105.625 90.9,102.125 95.1,102.125 95.1,105.625
  pour cut-out: 105.642,103.335 105.642,101.625 106.625,101.625
  pour cut-out: 106.8,105.875 111,105.875 111,105.625
  pour cut-out: 100.75,101.975 100.75,100.275 104.25,100.275 104.25,101.975
  pour cut-out: 100.75,111.475 104.25,111.475 104.25,109.75 100.75,109.75 100.75,109.775
  pour cut-out: 105.642,103.335 105.642,105.875 106.8,105.875
  pour cut-out: 123.259,113.235 123.259,110.825 120.95,110.825
  pour cut-out: 123.259,115.775 123.259,113.235 122.15,113.235
  pour cut-out: 119.61,116.884 122.15,116.884 122.15,115.775
  pour cut-out: 118.501,115.775 118.501,113.235 119.61,113.235
  pour cut-out: 118.501,113.235 118.501,110.875 119.25,110.875
  pour cut-out: 118.25,111.725 118.25,110.025 125.75,110.025 125.75,111.725
  pour cut-out: 131.99,101.046 129.43,101.046 129.43,102.135
  pour cut-out: 129.45,103.264 131.99,103.264 131.99,102.155
  pour cut-out: 127.85,99.375 123.9,99.375 123.9,100.975 127.85,100.975
  pour cut-out: 118.501,85.295 118.501,90.375 119.61,90.375
  pour cut-out: 119.61,94.024 122.15,94.024 122.15,92.915
  pour cut-out: 118.56,92.575 118.56,90.375 119.61,90.375
  pour cut-out: 119.61,89.266 122.15,89.266 122.15,90.375
  pour cut-out: 123.259,92.915 123.259,90.375 122.15,90.375
  pour cut-out: 124,92.475 124,90.775 127.5,90.775 127.5,92.475
  pour cut-out: 126.625,85 122.15,85 122.15,82.755
  pour cut-out: 122.25,81.659 124.625,81.659 124.625,84.2
  pour cut-out: 125.475,85 125.475,81.5 123.775,81.5 123.775,85
  pour cut-out: 122.15,86.404 119.61,86.404 119.61,85.295
  pour cut-out: 123.259,82.755 123.259,85.295 122.15,85.295
  pour cut-out: 119.61,81.646 122.25,81.646 122.25,82.75
  pour cut-out: 124.115,71.775 122.125,71.775 122.125,72.868
  pour cut-out: 125.6,71.775 125.6,73.704 122.15,73.704
  pour cut-out: 121.041,72.595 121.041,70.055 122.15,70.055
  pour cut-out: 123.259,64.975 123.259,72.595 122.15,72.595
  pour cut-out: 121.041,70.055 121.041,64.975 122.15,64.975
  pour cut-out: 108.187,58.475 111.75,58.475 111.75,57.831
  pour cut-out: 105.62,58.475 109.12,58.475 109.12,54.775 105.62,54.775
  pour cut-out: 105.642,63.617 105.642,66.125 106.875,66.125
  pour cut-out: 101,69.9 101,71.6 104.5,71.6 104.5,69.9
  pour cut-out: 101,62.35 101,60.65 104.5,60.65 104.5,62.35
  pour cut-out: 94.975,65.875 94.975,67.85 93.25,67.85 93.25,65.875
  pour cut-out: 90.9,65.907 90.9,62.407 94.975,62.407 94.975,65.875
  pour cut-out: 76.11,56.586 55.79,56.586 55.79,57.695
  pour cut-out: 54.681,57.695 54.681,59.5 77.219,59.5 77.219,57.695
  pour cut-out: 54.775,63.647 76.6,63.647 76.6,59.5 54.775,59.5
  pour cut-out: 48.767,83.934 48.767,82.065 50.71,82.065
  pour cut-out: 51.819,82.065 51.819,84.605 50.71,84.605
  pour cut-out: 43.625,98.1 43.625,76.275 47.125,76.275 47.125,98.1
  pour cut-out: 65.135,18.195 65.135,6.75 62.645,6.75
  pour cut-out: 68.834,4.21 68.834,6.75 67.725,6.75
  pour cut-out: 52.485,3.101 67.725,3.101 67.725,4.21
  pour cut-out: 51.376,6.75 51.376,4.21 52.485,4.21
  pour cut-out: 67.725,7.859 52.485,7.859 52.485,6.75
  pour cut-out: 58.625,18.705 64.625,18.705 64.625,18.195
  pour cut-out: 73.875,12.751 76.415,12.751 76.415,13.86
  pour cut-out: 65.805,26.385 73.875,26.385 73.875,24.02
  pour cut-out: 67.33,18.865 73.875,18.865 73.875,21.48
  pour cut-out: 65.805,19.365 67.33,19.365 67.33,18.865
  pour cut-out: 65.295,25.875 65.295,19.875 65.805,19.875
  pour cut-out: 72.766,13.86 72.766,29.1 73.875,29.1
  pour cut-out: 77.524,29.1 77.524,13.86 73.875,13.86
  pour cut-out: 73.875,30.209 76.415,30.209 76.415,29.1
  pour cut-out: 53.916,38.75 53.916,41.29 55.025,41.29
  pour cut-out: 70.265,37.641 55.025,37.641 55.025,38.75
  pour cut-out: 71.374,41.29 71.374,38.75 70.265,38.75
  pour cut-out: 55.025,42.399 70.265,42.399 70.265,41.29
  pour cut-out: 64.625,29.09 58.125,29.09 58.125,27.055
  pour cut-out: 64.635,27.055 64.635,28.58 65.135,28.58
  pour cut-out: 58.125,26.545 64.125,26.545 64.125,27.055
  pour cut-out: 55.892,28.103 54.5,28.103 54.5,27
  pour cut-out: 54.408,29.587 54.408,28.625 53.125,28.625
  pour cut-out: 56.945,18.865 50.5,18.865 50.5,20.75
  pour cut-out: 57.455,25.375 57.455,19.375 56.945,19.375
  pour cut-out: 48.875,32.749 46.335,32.749 46.335,31.64
  pour cut-out: 49.984,16.4 49.984,31.64 48.875,31.64
  pour cut-out: 46.335,15.291 48.875,15.291 48.875,16.4
  pour cut-out: 45.226,31.64 45.226,16.4 46.335,16.4
  pour cut-out: 7.895,8.385 7.895,10.78 6.795,10.78
  pour cut-out: 29.125,15.25 32.375,15.25 32.375,11.625 29,11.625
  pour cut-out: 22.34,17.5 22.34,20 24.34,20
  pour cut-out: 21.59,29.401 21.59,17.5 22.34,17.5
  pour cut-out: 29.855,8.095 29.855,15.86 33.495,15.86
  pour cut-out: 34.595,18.255 34.595,8.24 30.955,8.24
  pour cut-out: 33.311,21.499 33.311,23.48 29.863,23.48
  pour cut-out: 33.297,21.985 33.297,18.4 30.955,18.4
  pour cut-out: 25.5,23.625 28.125,23.625 28.125,21.625 25.5,21.625
  pour cut-out: 25.75,29.875 27.5,29.875 27.5,26.988 25.338,26.988
  pour cut-out: 34.595,33.495 34.595,23.48 30.955,23.48
  pour cut-out: 33.343,35.026 33.343,33.64 30.955,33.64
  pour cut-out: 33.351,38.576 33.351,36.18 30.955,36.18
  pour cut-out: 34.595,41.405 34.595,38.72 33.495,38.72
  pour cut-out: 31.1,42.36 33.495,42.36 33.495,41.26
  pour cut-out: 3.155,10.925 3.155,8.24 4.255,8.24
  pour cut-out: 4.4,14.76 4.4,10.78 6.795,10.78
  pour cut-out: 4.4,14.76 6.795,14.76 6.795,15.86
  pour cut-out: 4.407,29.714 4.407,26.125 6.875,26.125
  pour cut-out: 4.407,27.406 4.407,26.02 6.795,26.02
  pour cut-out: 4.433,29.713 4.433,31.099 6.846,31.099
  pour cut-out: 4.4,27.12 6.795,27.12 6.795,26.02
  pour cut-out: 3.155,26.165 3.155,15.86 4.255,15.86
  pour cut-out: 5.375,38.5 8.75,38.5 8.75,34.125 5.25,34.125
  pour cut-out: 3.155,41.405 3.155,31.1 4.255,31.1
  pour cut-out: 33.64,7.14 30.955,7.14 30.955,8.24
  pour cut-out: 15.875,27.25 14.5,27.25 14.5,28.875 16,28.875
  pour cut-out: 11.625,27.25 11.625,22.78 15.375,22.78 15.375,26.875
  pour cut-out: 7.375,20.5 7.375,14.375 12.75,14.375 12.75,20.75
  pour cut-out: 4.11,42.36 6.795,42.36 6.795,41.26
  pour cut-out: 4.11,7.14 6.875,7.14 6.875,8.24 6.795,8.24

## Silkscreen, mask and mechanical layers (free items; w line width, h text height)
Top Overlay:
  drawing of 178 lines, arcs and shapes, not listed
  text "IO4_1" at 93.918,117.711 h0.6 r45
  text "IO0_7" at 58.293,117.586 h0.6 r45
  text "IO0_6" at 60.793,117.586 h0.6 r45
  text "IO0_5" at 63.293,117.586 h0.6 r45
  text "IO0_4" at 65.918,117.586 h0.6 r45
  text "IO0_3" at 68.418,117.586 h0.6 r45
  text "IO0_2" at 71.043,117.586 h0.6 r45
  text "IO0_0" at 76.043,117.586 h0.6 r45
  text "IO4_7" at 78.543,117.586 h0.6 r45
  text "IO4_6" at 81.293,117.586 h0.6 r45
  text "IO4_5" at 83.668,117.586 h0.6 r45
  text "IO4_4" at 86.168,117.586 h0.6 r45
  text "IO4_3" at 88.793,117.586 h0.6 r45
  text "IO4_2" at 91.168,117.586 h0.6 r45
  text "IO4_0" at 96.543,117.586 h0.6 r45
  text "IO0_1" at 73.543,117.461 h0.6 r45
  text "40-bit I2C I/O port with RESET, OE and INT" at 1.879,117.172 h3
  text "CH0" at 50.589,107.422 h3
  text "CH4" at 76.936,107.375 h3
  text "3" at 55.525,106.175 h0.6
  text "2" at 57.86,106.175 h0.6
  text "1" at 60.096,106.175 h0.6
  text "0" at 62.331,106.175 h0.6
  text "7" at 64.666,106.175 h0.6
  text "6" at 66.775,106.175 h0.6
  text "5" at 69.025,106.175 h0.6
  text "4" at 71.275,106.175 h0.6
  text "3" at 73.525,106.175 h0.6
  text "2" at 75.775,106.175 h0.6
  text "SDA & SCL TO MC/F" at 93,100.8 h0.6
  text "CH4" at 83.813,100.219 h3 r270
  text "CH0" at 47.828,98.218 h3 r90
  text "4" at 48,96.8 h0.6
  text "IO0_3 / VSS / IO0_2 / IO0_1 / IO0_0 / SCL / SDA / nRESET / nINT / IO4_7 / IO4_6 / IO4_5 / VSS / IO4_4" at 73.618,96.801 h0.6 r90
  text "5" at 48,94.55 h0.6
  text "1" at 82.775,94.425 h0.6
  text "6" at 48,92.3 h0.6
  text "0" at 82.775,92.175 h0.6
  text "7" at 48,89.925 h0.6
  text "7" at 82.775,89.925 h0.6
  text "0" at 48,87.925 h0.6
  text "6" at 82.775,87.675 h0.6
  text "RESET TO MC/F / LED TO ON/OFF" at 93,86.38 h0.6
  text "1" at 48,85.675 h0.6
  text "5" at 82.775,85.425 h0.6
  text "2" at 48,83.487 h0.6
  text "4" at 82.775,83.175 h0.6
  text "3" at 48,81.075 h0.6
  text "3" at 82.775,80.925 h0.6
  text "PCA9505DGG / PCA9506DGG" at 16.588,78.911 h3
  text "4" at 48,78.925 h0.6
  text "PCA9506BS" at 60.463,78.742 h3
  text "2" at 82.775,78.675 h0.6
  text "IO0_4 / IO0_5 / IO0_6 / VSS / IO0_7 / IO1_0 / IO1_1 / IO1_2 / IO1_3 / IO1_4 / VDD / IO1_5 / IO1_6 / IO1_7" at 54.75,77.807 h0.6
  text "IO4_3 / IO4_2 / IO4_1 / VDD / IO4_0 / IO3_7 / IO3_6 / IO3_5 / IO3_4 / IO3_3 / VSS / IO3_2 / IO3_1 / IO3_0" at 73.876,77.807 h0.6
  text "5" at 48,76.65 h0.6
  text "1" at 82.775,76.425 h0.6
  text "A1 & A0 TO MC/F" at 93.25,74.55 h0.6
  text "0" at 82.775,74.175 h0.6
  text "CH3" at 83.813,73.532 h3 r270
  text "CH1" at 47.703,72.006 h3 r90
  text "IO2_0 / VSS / IO2_1 / IO2_2 / IO2_3 / A0 / A1 / A2 / nOE / IO2_4 / IO2_5 / IO2_6 / VSS / IO2_7" at 73.618,71.5 h0.6 r90
  text "SDA / SCL / IO0_0 / IO0_1 / IO_2 / VSS / IO0_3 / IO0_4 / IO0_5 / IO0_6 / VSS / IO0_7 / IO1_0 / IO1_1 / IO1_2 / IO1_3 / IO1_4 / VDD / IO1_5 / IO1_6 / IO1_7 / IO2_0 / VSS / IO2_1 / IO2_2 / IO2_3 / A0 / A1" at 11.5,71.349 h0.6
  text "nRESET / nINT / IO4_7 / IO4_6 / IO4_5 / VSS / IO4_4 / IO4_3 / IO4_2 / IO4_1 / VDD / IO4_0 / IO3_7 / IO3_6 / IO3_5 / IO3_4 / IO3_3 / VSS / IO3_2 / IO3_1 / IO3_0 / IO2_7 / VSS / IO2_6 / IO2_5 / IO2_4 / nOE / A2" at 28.901,71.349 h0.6
  text "M1-SPI-ATM64 (V2)" at 118.203,64.798 h5 r90
  text "6" at 55.275,64.675 h0.6
  text "7" at 57.525,64.675 h0.6
  text "0" at 59.775,64.675 h0.6
  text "1" at 61.9,64.675 h0.6
  text "2" at 64.15,64.675 h0.6
  text "3" at 66.525,64.675 h0.6
  text "4" at 68.65,64.675 h0.6
  text "5" at 70.9,64.675 h0.6
  text "6" at 73.15,64.675 h0.6
  text "7" at 75.4,64.675 h0.6
  text "A2 & OE TO MC/F" at 93.375,61.245 h0.6
  text "CH2" at 76.718,60 h3
  text "CH1" at 50.381,59.969 h3
  text "ИЛ1428ТО1/1" at 116.587,52.933 h5
  text "IO2_3" at 63.444,50.754 h0.6 r90
  text "IO1_3" at 64.444,50.754 h0.6 r90
  text "IO3_0" at 76.625,50.75 h0.6 r90
  text "IO3_1" at 79.5,50.75 h0.6 r90
  text "IO3_2" at 82.125,50.75 h0.6 r90
  text "IO3_3" at 84.75,50.75 h0.6 r90
  text "A0" at 86.375,50.75 h0.6 r90
  text "IO3_4" at 87.25,50.75 h0.6 r90
  text "A1" at 88.75,50.75 h0.6 r90
  text "IO3_5" at 89.625,50.75 h0.6 r90
  text "A2" at 91.25,50.75 h0.6 r90
  text "IO3_6" at 92.125,50.75 h0.6 r90
  text "OE" at 93.875,50.75 h0.6 r90
  text "IO3_7" at 94.75,50.75 h0.6 r90
  text "IO2_0" at 55.791,50.729 h0.6 r90
  text "IO1_0" at 56.791,50.729 h0.6 r90
  text "IO2_1" at 58.416,50.729 h0.6 r90
  text "IO1_1" at 59.416,50.729 h0.6 r90
  text "IO2_2" at 60.874,50.729 h0.6 r90
  text "IO1_2" at 61.874,50.729 h0.6 r90
  text "IO2_4" at 66.026,50.729 h0.6 r90
  text "IO1_4" at 67.026,50.729 h0.6 r90
  text "IO2_5" at 68.538,50.729 h0.6 r90
  text "IO1_5" at 69.538,50.729 h0.6 r90
  text "IO2_6" at 71.038,50.729 h0.6 r90
  text "IO1_6" at 72.038,50.729 h0.6 r90
  text "IO2_7" at 73.621,50.729 h0.6 r90
  text "IO1_7" at 74.621,50.729 h0.6 r90
  text "RESET" at 83.75,50.7 h0.6 r90
  text "SCL" at 78.5,50.625 h0.6 r90
  text "SDA" at 81.125,50.625 h0.6 r90
  text "55" at 54.35,42.425 h0.6
  text "EP" at 49.975,40.925 h0.6
  text "2" at 7.85,40.832 h0.6
  text "1" at 2.5,40.8 h0.6
  text "56" at 28.062,40.79 h0.6
  text "55" at 34.85,40.8 h0.6
  text "43" at 71.35,40.8 h0.6
  text "EP" at 49.975,38.3 h0.6
  text "44" at 71.35,38.3 h0.6
  text "56" at 54.35,36.8 h0.6
  text "EP" at 73.225,32.925 h0.6
  text "EP" at 75.85,32.925 h0.6
  text "1" at 44.375,31.175 h0.6
  text "2" at 50.025,31.175 h0.6
  text "42" at 71.6,28.675 h0.6
  text "41" at 77.35,28.675 h0.6
  text "13" at 43.9,16.05 h0.6
  text "14" at 49.9,16.05 h0.6
  text "EP" at 43.975,13.425 h0.6
  text "EP" at 49.975,13.425 h0.6
  text "30" at 73.225,11.8 h0.6
  text "29" at 75.85,11.8 h0.6
  text "B___" at 8.946,9.501 h4
  text "16" at 51.9,7.925 h0.6
  text "27" at 1.725,7.8 h0.6
  text "28" at 7.975,7.8 h0.6
  text "30" at 28.35,7.8 h0.6
  text "29" at 34.725,7.8 h0.6
  text "28" at 66.975,7.8 h0.6
  text "EP" at 71.475,6.3 h0.6
  text "EP" at 71.475,3.8 h0.6
  text "B___" at 78.499,2.321 h4 r90
  text "15" at 51.85,2.175 h0.6
  text "27" at 67.1,2.175 h0.6
  text "TO PLD-56" at 48.423,1.179 h3 r90
Bottom Overlay:
  text "ИЛ1428ТО1/1" at 137.663,53.558 h5
Board:
  lines w0.2: 10.3,48.502 cw(c9.958,47.502) 10.3,46.502 2.533,46.502 cw(c2.587,47.448) 1.641,47.502 cw(c2.633,47.494) 2.641,48.486 10.3,48.511 ; 23.835,48.539 cw(c23.493,47.539) 23.835,46.539 16.068,46.539 cw(c16.122,47.485) 15.175,47.539 cw(c16.167,47.531) 16.175,48.523 23.835,48.548 ; 37.335,48.664 cw(c36.993,47.664) 37.335,46.664 29.568,46.664 cw(c29.622,47.61) 28.675,47.664 cw(c29.667,47.656) 29.675,48.648 37.335,48.673 ; 40.864,35.752 cw(c39.864,36.094) 38.864,35.752 38.864,43.519 cw(c39.811,43.465) 39.864,44.411 cw(c39.856,43.419) 40.849,43.411 40.874,35.752 ; 40.901,22.217 cw(c39.901,22.559) 38.901,22.217 38.901,29.984 cw(c39.848,29.93) 39.901,30.877 cw(c39.893,29.885) 40.886,29.877 40.911,22.217 ; 41.026,8.717 cw(c40.026,9.059) 39.026,8.717 39.026,16.484 cw(c39.973,16.43) 40.026,17.377 cw(c40.018,16.385) 41.011,16.377 41.036,8.717 ; 52.07,48.619 cw(c51.728,47.619) 52.07,46.619 44.303,46.619 cw(c44.357,47.565) 43.41,47.619 cw(c44.402,47.611) 44.41,48.603 52.07,48.628 ; 65.604,48.656 cw(c65.262,47.656) 65.604,46.656 57.837,46.656 cw(c57.891,47.602) 56.945,47.656 cw(c57.937,47.648) 57.945,48.64 65.604,48.665 ; 79.104,48.781 cw(c78.762,47.781) 79.104,46.781 71.337,46.781 cw(c71.391,47.727) 70.445,47.781 cw(c71.437,47.773) 71.445,48.765 79.104,48.79 ; 83.653,35.307 cw(c82.653,35.649) 81.653,35.307 81.653,43.074 cw(c82.599,43.02) 82.653,43.967 cw(c82.645,42.975) 83.637,42.967 83.662,35.307 ; 83.69,21.773 cw(c82.69,22.115) 81.69,21.773 81.69,29.54 cw(c82.636,29.486) 82.69,30.432 cw(c82.682,29.44) 83.674,29.432 83.699,21.773 ; 83.815,8.273 cw(c82.815,8.615) 81.815,8.273 81.815,16.04 cw(c82.761,15.986) 82.815,16.932 cw(c82.807,15.94) 83.799,15.932 83.824,8.273 ; 93.945,48.744 cw(c93.603,47.744) 93.945,46.744 86.178,46.744 cw(c86.232,47.69) 85.285,47.744 cw(c86.277,47.736) 86.285,48.728 93.945,48.753 ; 107.479,48.781 cw(c107.137,47.781) 107.479,46.781 99.712,46.781 cw(c99.766,47.727) 98.82,47.781 cw(c99.812,47.773) 99.82,48.765 107.479,48.79 ; 120.979,48.906 cw(c120.637,47.906) 120.979,46.906 113.212,46.906 cw(c113.266,47.852) 112.32,47.906 cw(c113.312,47.898) 113.32,48.89 120.979,48.915 ; 135.82,48.869 cw(c135.478,47.869) 135.82,46.869 128.053,46.869 cw(c128.107,47.815) 127.16,47.869 cw(c128.152,47.861) 128.16,48.853 135.82,48.878 ; 0,0 0,122 145,122 145,0 0,0

## Dimensions
145,122 to 145,0 on Dimensions
145,122 to 0,122 on Dimensions

## Text inside footprints (layer, text, board x,y; h text height)
K1: Bottom Overlay "+" at 105.47,109.075 h2 r180; Bottom Overlay "-" at 105.32,103.765 h2 r180
K2: Bottom Overlay "+" at 105.47,95.836 h2 r180; Bottom Overlay "-" at 105.32,90.526 h2 r180
K3: Bottom Overlay "-" at 105.32,77.286 h2 r180; Bottom Overlay "+" at 105.47,82.596 h2 r180
K4: Bottom Overlay "+" at 105.47,69.357 h2 r180; Bottom Overlay "-" at 105.32,64.047 h2 r180
X2: Top Overlay "HVQFN-56" at 45.915,1.165 h3 r90
X3: Top Overlay "HVQFN-56 to PLD-56" at 58.522,91.819 h2
X5: Top Overlay "TSSOP-56 to PBD-56" at 14.692,68.348 h2